# Altium PCB CLLC_PrimarySide_v13.PcbDoc (part 1 of 2)
Units mm, origin at the board's own origin, x right, y up, seen from the top; angles counter-clockwise.
Board outline 161.1 x 167.75 mm, 4 copper layers (GND, SIG, HVDC, GND/OUTPUT), stack 1.369 mm thick; 89 components, 34 nets, 222 pads, 484 vias.
Unrouted connection lines stored in the file: 15.
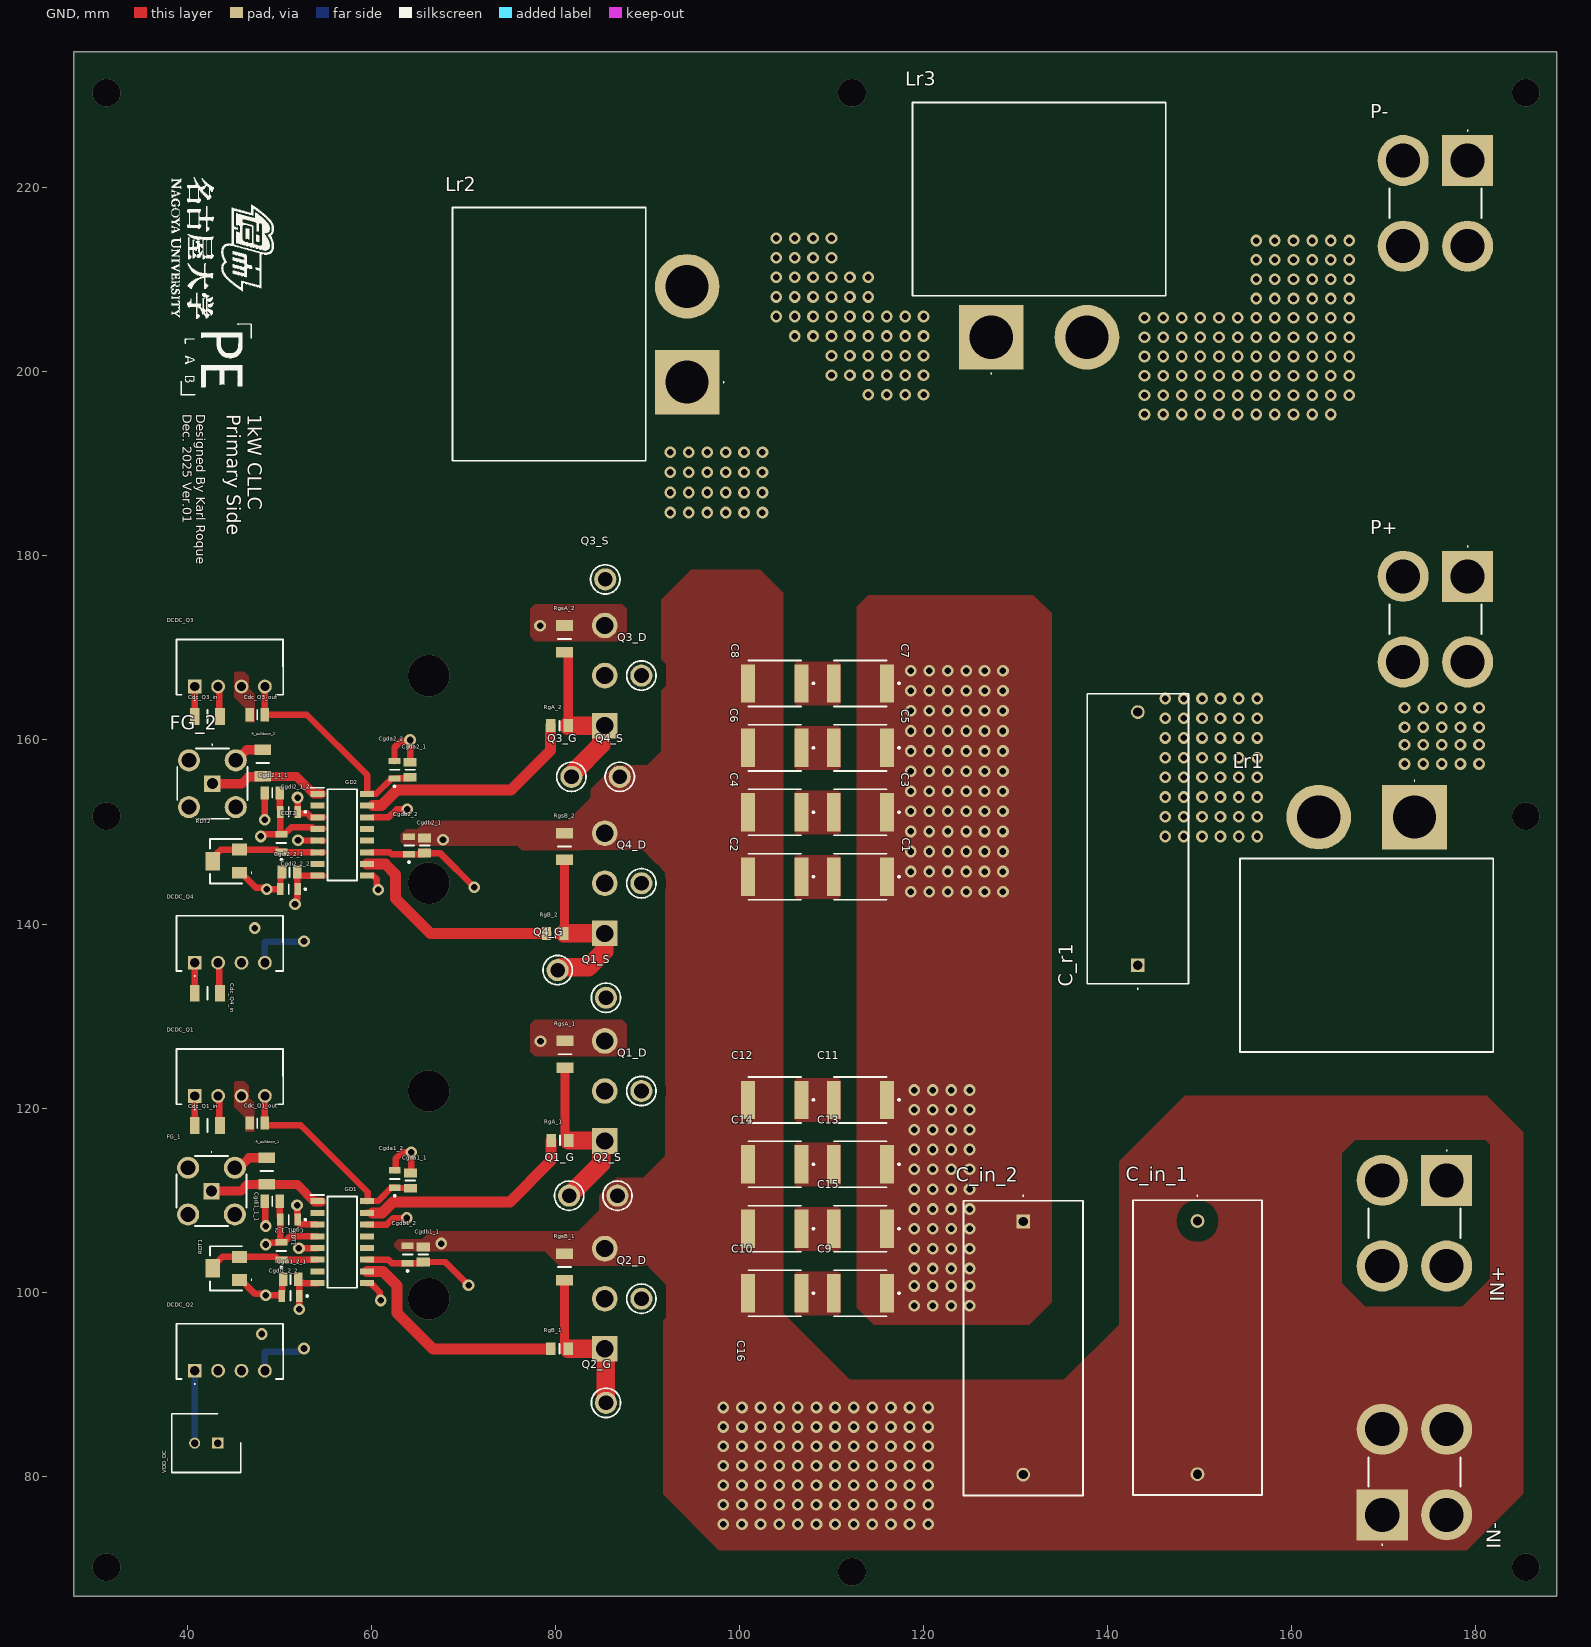
[diagram p0: GND view]
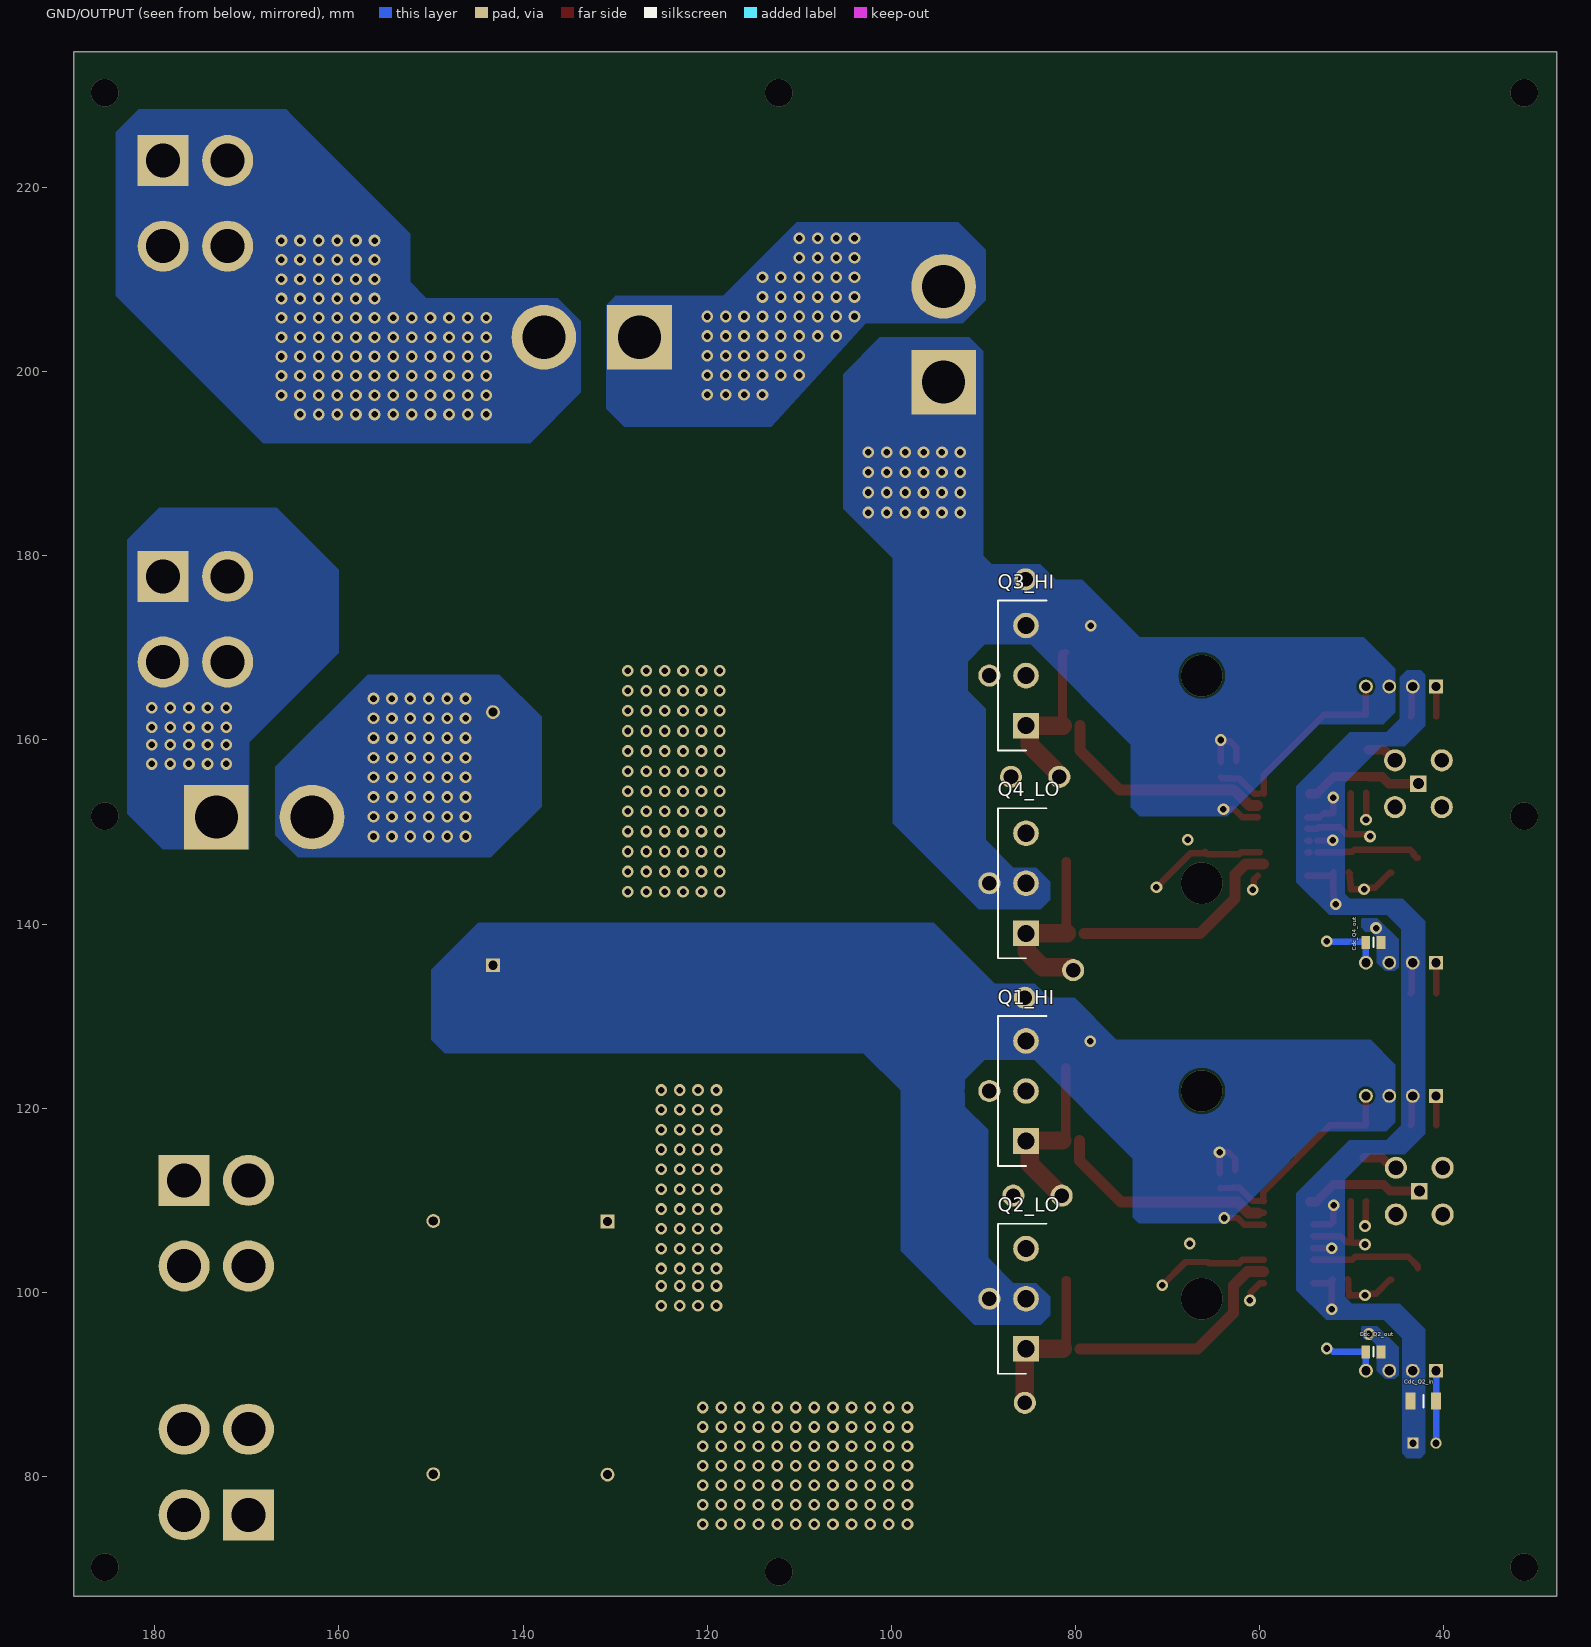
[diagram p1: GND/OUTPUT view, seen from below]
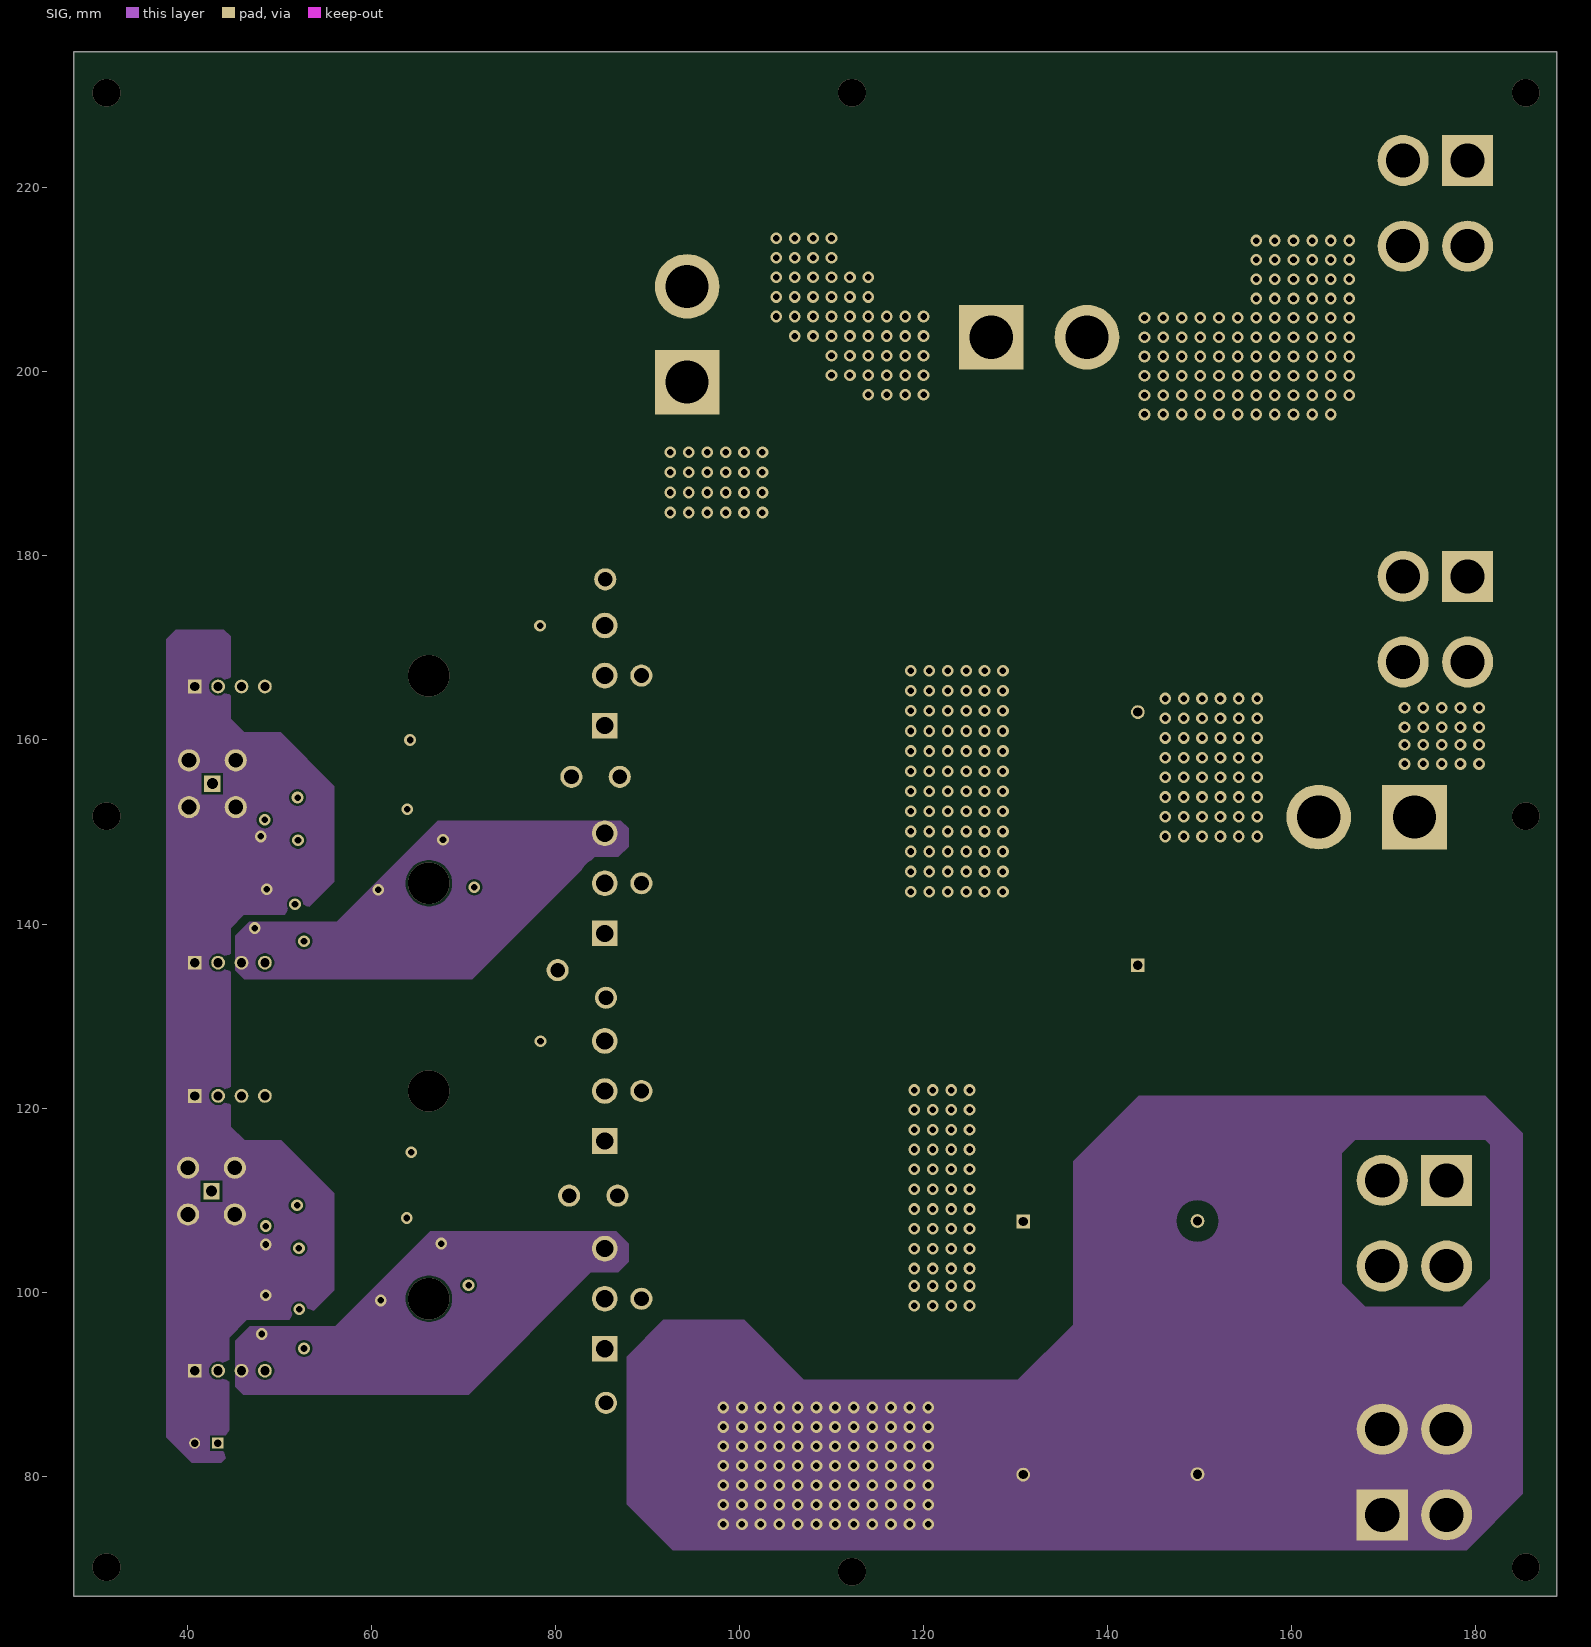
[diagram p2: SIG]
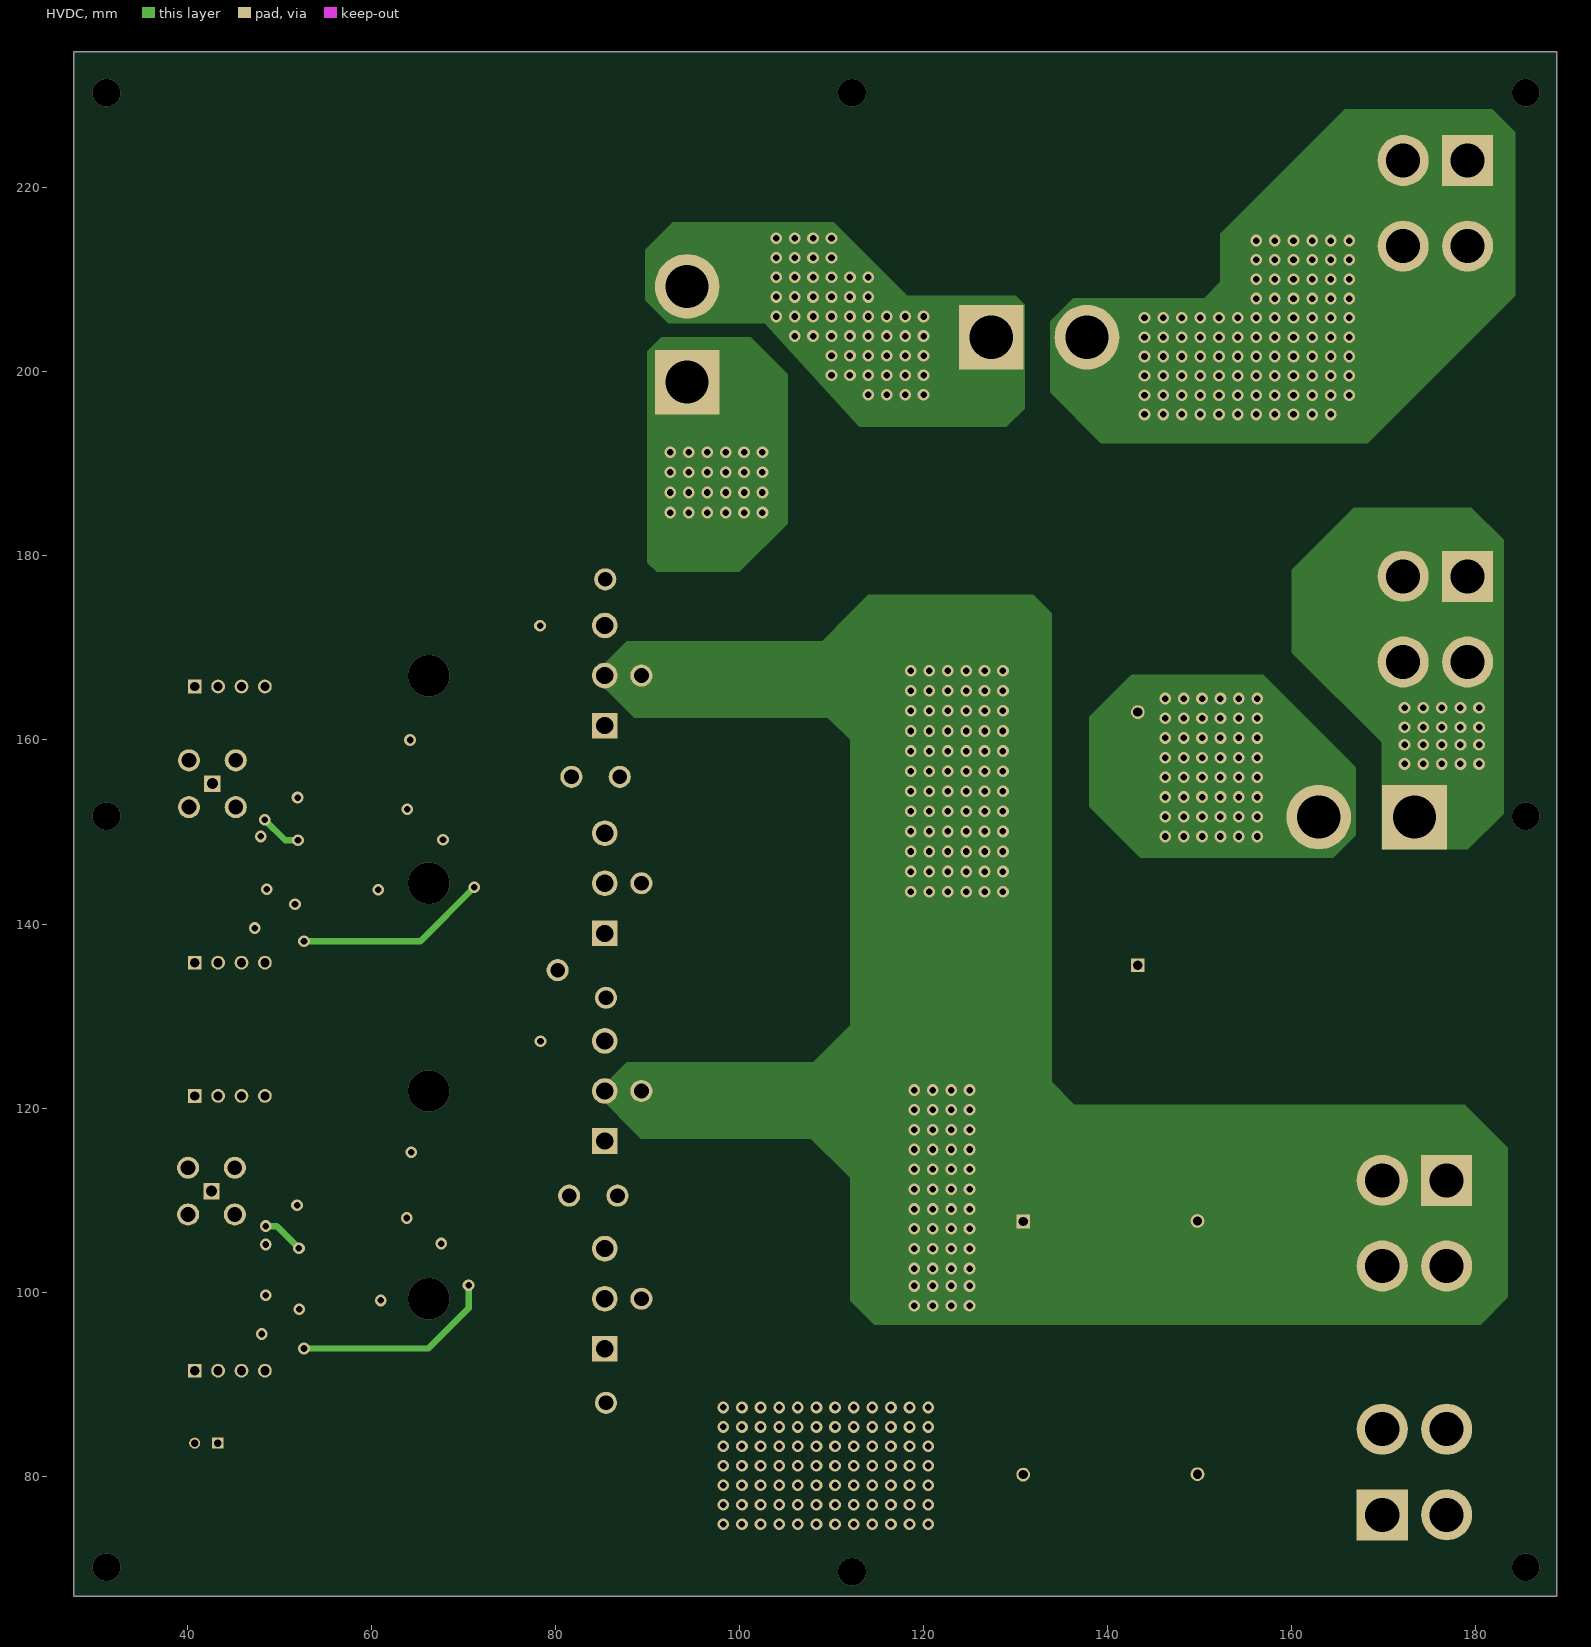
[diagram p3: HVDC]
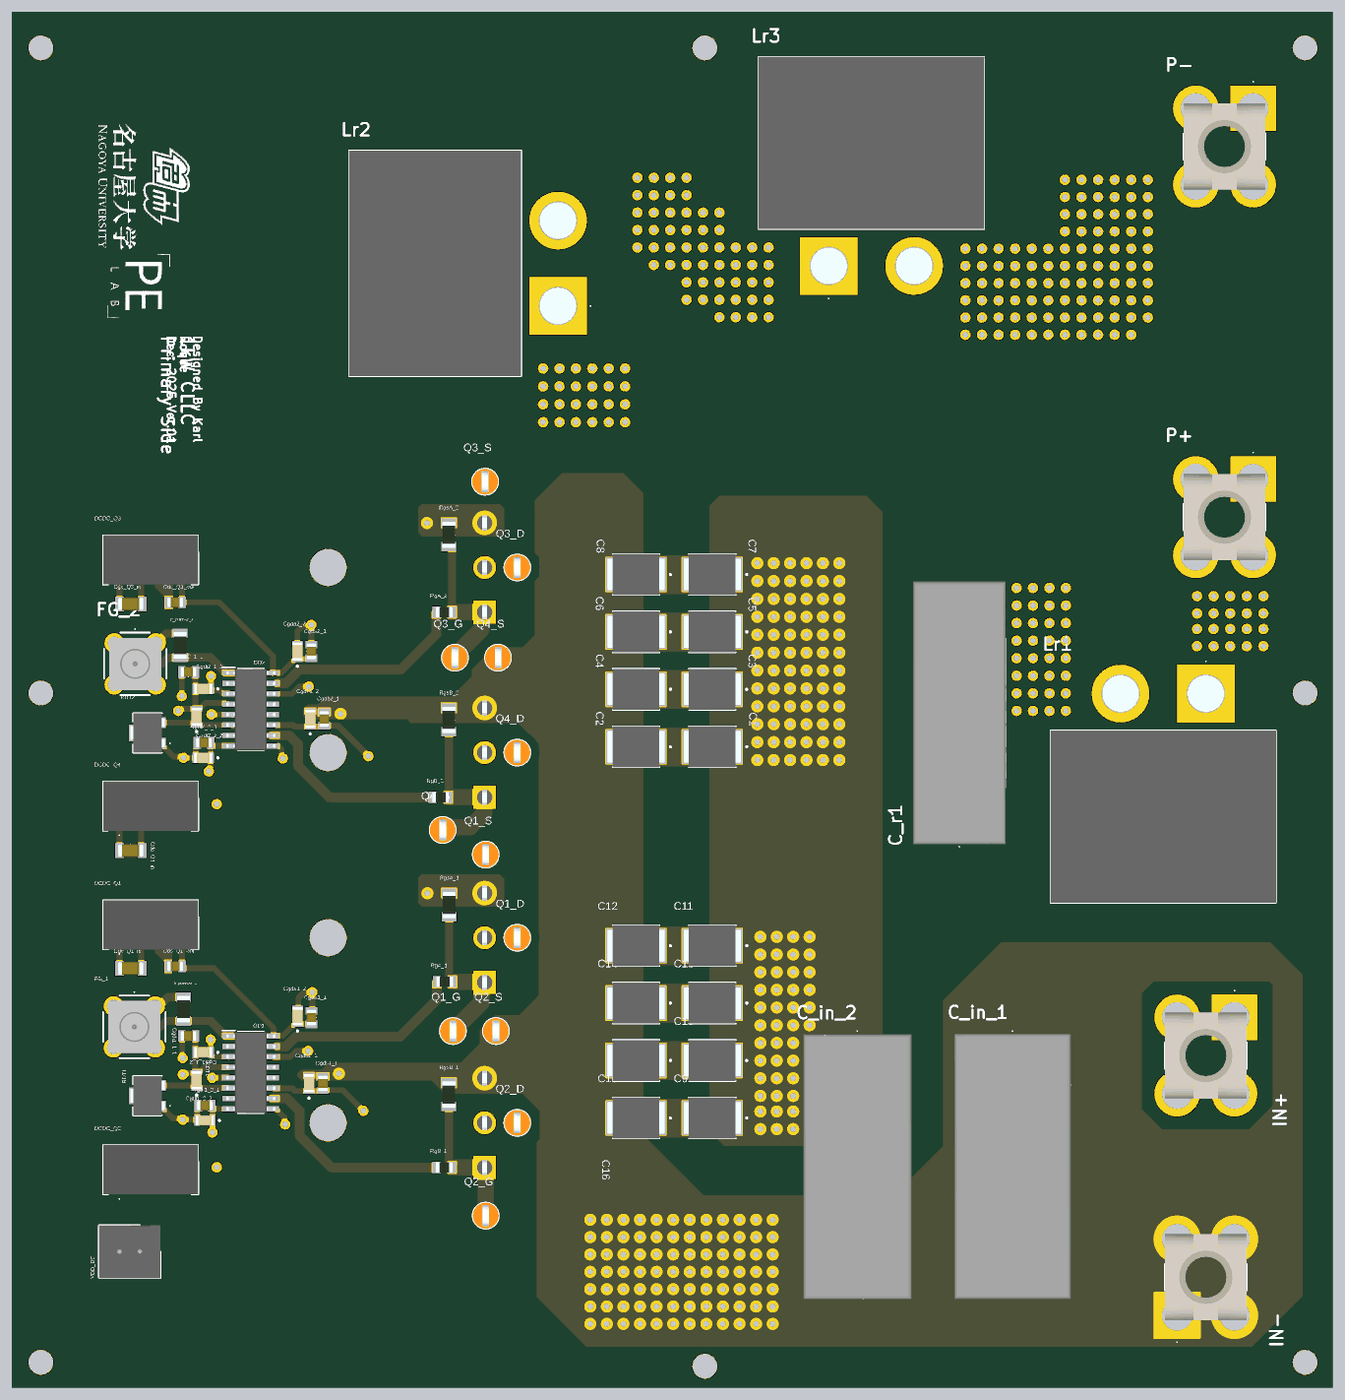
[diagram p5: 3D render of the assembled board from above, using the file's embedded part models]
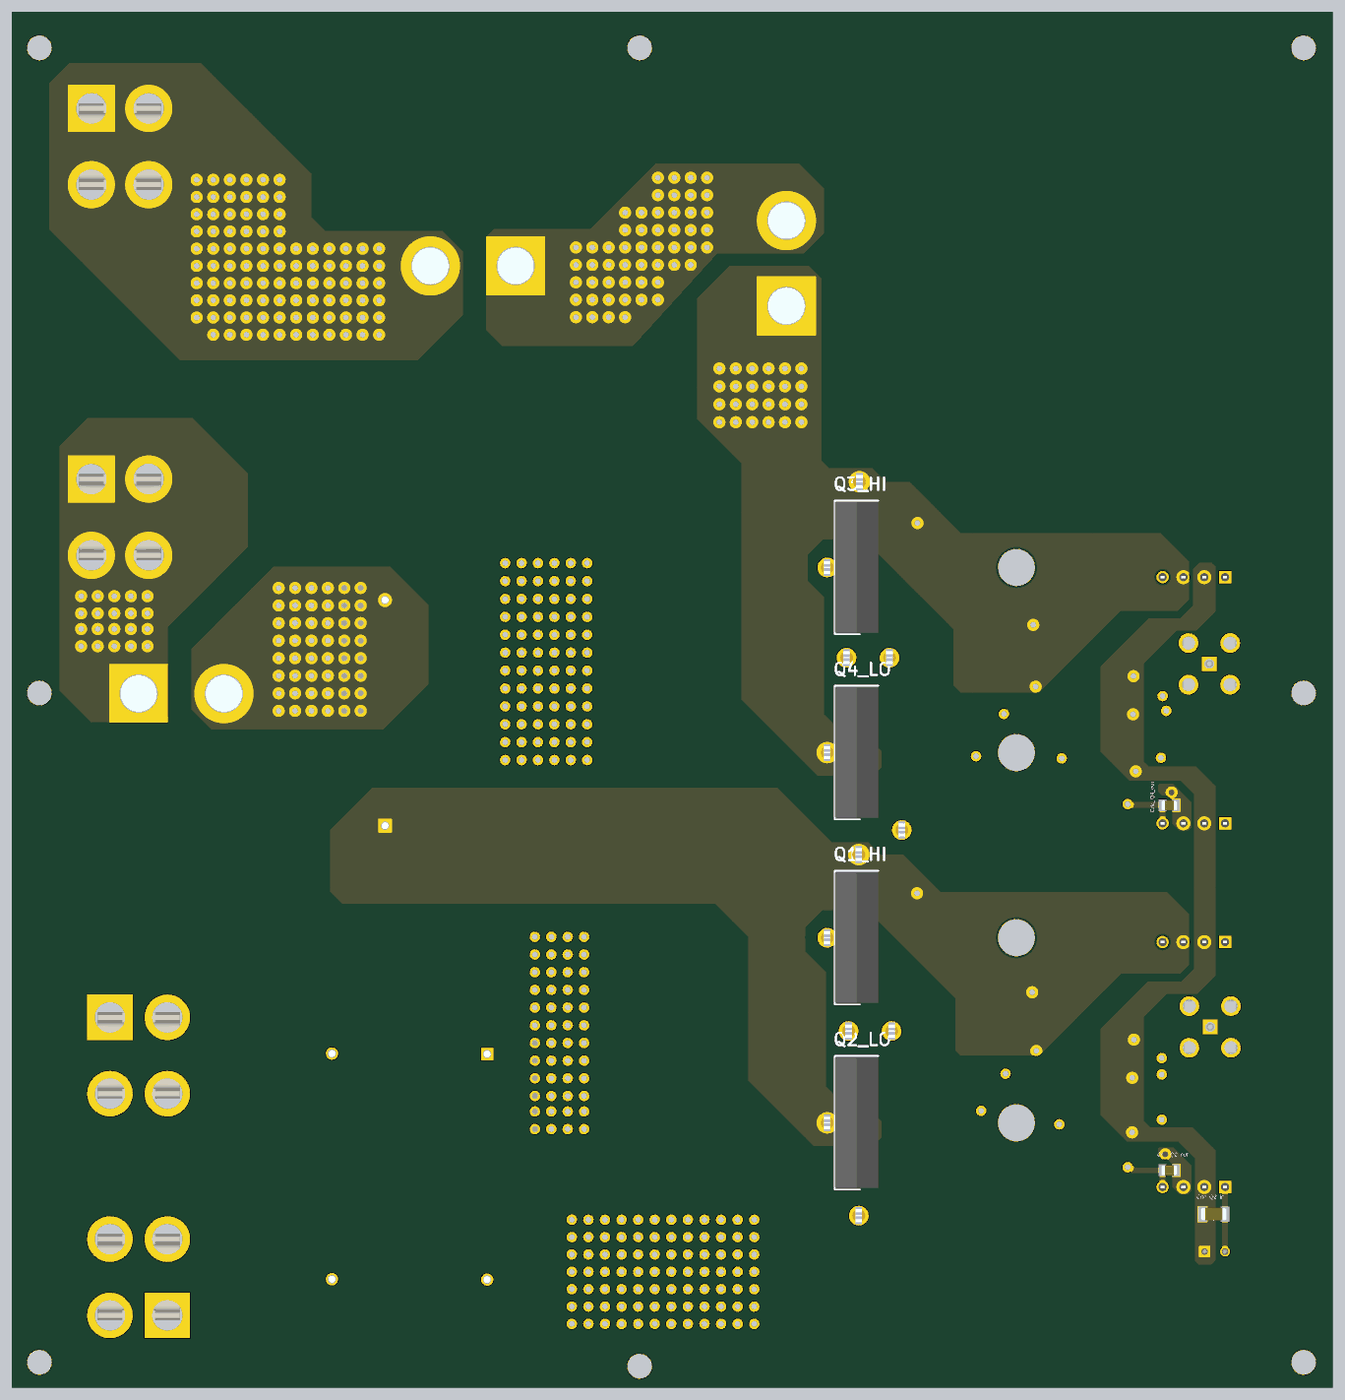
[diagram p6: 3D render of the assembled board from below, using the file's embedded part models]

## Layer stack, top to bottom
Top Solder: solder mask 0.0254, SM-001, Dk 4
GND: signal copper 0.035
Dielectric 1: prepreg 0.1295, PP-017, Dk 4.3
Dielectric 2: prepreg 0.1295, PP-017, Dk 4.3
SIG: signal copper 0.035
Dielectric 3: core 0.7112, Core-039, Dk 4.8
HVDC: signal copper 0.035
Dielectric 4: prepreg 0.1295, PP-017, Dk 4.3
Dielectric 5: prepreg 0.1295, PP-017, Dk 4.3
GND/OUTPUT: signal copper 0.035
Bottom Solder: solder mask 0.0254, SM-001, Dk 4

## Board outline
188.8,234.75 188.8,67 27.7,67 27.7,234.75

## Design rules (kind name [scope] priority, off if disabled: settings)
Clearance Clearance_2 [InNet('Q3_S') vs InNet('Q2_S')] p1: gap=1.5 ignorepadtopadclearanceinfootprint=FALSE
Clearance Clearance_4 [InNet('Q1_D') vs InNet('Q2_S')] p2: gap=1.5 ignorepadtopadclearanceinfootprint=FALSE
Clearance Clearance_1 [InNet('Q1_D') vs InNet('Q1_S')] p3: gap=1.5 ignorepadtopadclearanceinfootprint=FALSE
Clearance [InNet('Q1_S') vs InNet('Q2_S')] p4: gap=1.5 ignorepadtopadclearanceinfootprint=FALSE
Clearance Clearance_3 [All] p5: gap=0.254 ignorepadtopadclearanceinfootprint=FALSE
PolygonConnect PolygonConnect_16 [All vs IsNamedPolygon('GND-Q2_S') Or IsNamedPolygon('NETC1_2_L01_P158') Or IsNamedPolygon('NETC3_2_L01_P157') Or IsNamedPolygon('NETC5_2_L01_P156') Or IsNamedPolygon('NETC7_2_L01_P155') Or IsNamedPolygon('NETC9_2_L01_P162') Or IsNamedPolygon('NETC11_2_L01_P159') Or IsNamedPolygon('NETC13_2_L01_P160') Or IsNamedPolygon('NETC15_2_L01_P161') Or IsNamedPolygon('Q1_D_L01_P102') Or IsNamedPolygon('Q1_S_L01_P130') Or IsNamedPolygon('Q1_S_L01_P195') Or IsNamedPolygon('Q3_S_L01_P129') Or IsNamedPolygon('Q3_S_L01_P194') Or IsNamedPolygon('GND-Q2_S') Or IsNamedPolygon('NETCDC_Q1_IN_2_L02_P172') Or IsNamedPolygon('Q2_S_L02_P173') Or IsNamedPolygon('Q2_S_L02_P197') Or IsNamedPolygon('HVDC-Q1_D') Or IsNamedPolygon('NETC_R1_2_L03_P143') Or IsNamedPolygon('NETLR1_S1_L03_P151') Or IsNamedPolygon('NETLR2_F1_L03_P145') Or IsNamedPolygon('NETLR3_F1_L03_P152') Or IsNamedPolygon('Q3_S_L03_P163') Or IsNamedPolygon('GND/OUTPUT-NetCdc_Q1_in_1') Or IsNamedPolygon('GND/OUTPUT-Q1_S') Or IsNamedPolygon('GND/OUTPUT-Q3_S') Or IsNamedPolygon('NETC_R1_2_L04_P150') Or IsNamedPolygon('NETLR1_S1_L04_P147') Or IsNamedPolygon('NETLR2_F1_L04_P154') Or IsNamedPolygon('NETLR3_F1_L04_P146') Or IsNamedPolygon('Q2_S_L04_P174') Or IsNamedPolygon('Q2_S_L04_P198')] p1: connectstyle=Direct reliefconductorwidth=0.254 reliefentries=4 polygonreliefangle="90 Angle" airgapwidth=0.254
PolygonConnect PolygonConnect_15 [All vs IsNamedPolygon('Q2_S_L04_P198')] p2: thpad.connectstyle=Direct thpad.reliefconductorwidth=0.254 thpad.reliefentries=4 thpad.polygonreliefangle="90 Angle" thpad.airgapwidth=0.254 smdpad.connectstyle=Relief smdpad.reliefconductorwidth=0.254 smdpad.reliefentries=4 smdpad.polygonreliefangle="90 Angle" smdpad.airgapwidth=0.254 via.connectstyle=Relief via.reliefconductorwidth=0.254 via.reliefentries=4 via.polygonreliefangle="90 Angle" via.airgapwidth=0.254
PolygonConnect PolygonConnect_14 [All vs IsNamedPolygon('GND-Q2_S') Or IsNamedPolygon('NETC1_2_L01_P158') Or IsNamedPolygon('NETC3_2_L01_P157') Or IsNamedPolygon('NETC5_2_L01_P156') Or IsNamedPolygon('NETC7_2_L01_P155') Or IsNamedPolygon('NETC9_2_L01_P162') Or IsNamedPolygon('NETC11_2_L01_P159') Or IsNamedPolygon('NETC13_2_L01_P160') Or IsNamedPolygon('NETC15_2_L01_P161') Or IsNamedPolygon('Q1_D_L01_P102') Or IsNamedPolygon('Q1_S_L01_P130') Or IsNamedPolygon('Q1_S_L01_P195') Or IsNamedPolygon('Q3_S_L01_P129') Or IsNamedPolygon('Q3_S_L01_P194') Or IsNamedPolygon('GND-Q2_S') Or IsNamedPolygon('NETCDC_Q1_IN_2_L02_P172') Or IsNamedPolygon('Q2_S_L02_P173') Or IsNamedPolygon('Q2_S_L02_P197') Or IsNamedPolygon('HVDC-Q1_D') Or IsNamedPolygon('NETC_R1_2_L03_P143') Or IsNamedPolygon('NETLR1_S1_L03_P151') Or IsNamedPolygon('NETLR2_F1_L03_P145') Or IsNamedPolygon('NETLR3_F1_L03_P152') Or IsNamedPolygon('Q3_S_L03_P163') Or IsNamedPolygon('GND/OUTPUT-NetCdc_Q1_in_1') Or IsNamedPolygon('GND/OUTPUT-Q1_S') Or IsNamedPolygon('GND/OUTPUT-Q3_S') Or IsNamedPolygon('NETC_R1_2_L04_P150') Or IsNamedPolygon('NETLR1_S1_L04_P147') Or IsNamedPolygon('NETLR2_F1_L04_P154') Or IsNamedPolygon('NETLR3_F1_L04_P146') Or IsNamedPolygon('Q2_S_L04_P174') Or IsNamedPolygon('Q2_S_L04_P198')] p3: thpad.connectstyle=Direct thpad.reliefconductorwidth=0.254 thpad.reliefentries=4 thpad.polygonreliefangle="90 Angle" thpad.airgapwidth=0.254 smdpad.connectstyle=Relief smdpad.reliefconductorwidth=0.254 smdpad.reliefentries=4 smdpad.polygonreliefangle="90 Angle" smdpad.airgapwidth=0.254 via.connectstyle=Relief via.reliefconductorwidth=0.254 via.reliefentries=4 via.polygonreliefangle="90 Angle" via.airgapwidth=0.254
PolygonConnect PolygonConnect_13 [All vs IsNamedPolygon('GND-Q2_S') Or IsNamedPolygon('NETC1_2_L01_P158') Or IsNamedPolygon('NETC3_2_L01_P157') Or IsNamedPolygon('NETC5_2_L01_P156') Or IsNamedPolygon('NETC7_2_L01_P155') Or IsNamedPolygon('NETC9_2_L01_P162') Or IsNamedPolygon('NETC11_2_L01_P159') Or IsNamedPolygon('NETC13_2_L01_P160') Or IsNamedPolygon('NETC15_2_L01_P161') Or IsNamedPolygon('Q1_D_L01_P102') Or IsNamedPolygon('Q1_S_L01_P130') Or IsNamedPolygon('Q1_S_L01_P195') Or IsNamedPolygon('Q3_S_L01_P129') Or IsNamedPolygon('Q3_S_L01_P194') Or IsNamedPolygon('GND-Q2_S') Or IsNamedPolygon('NETCDC_Q1_IN_2_L02_P172') Or IsNamedPolygon('Q2_S_L02_P173') Or IsNamedPolygon('Q2_S_L02_P197') Or IsNamedPolygon('HVDC-Q1_D') Or IsNamedPolygon('NETC_R1_2_L03_P143') Or IsNamedPolygon('NETLR1_S1_L03_P151') Or IsNamedPolygon('NETLR2_F1_L03_P145') Or IsNamedPolygon('NETLR3_F1_L03_P152') Or IsNamedPolygon('Q3_S_L03_P163') Or IsNamedPolygon('GND/OUTPUT-NetCdc_Q1_in_1') Or IsNamedPolygon('GND/OUTPUT-Q1_S') Or IsNamedPolygon('GND/OUTPUT-Q3_S') Or IsNamedPolygon('NETC_R1_2_L04_P150') Or IsNamedPolygon('NETLR1_S1_L04_P147') Or IsNamedPolygon('NETLR2_F1_L04_P154') Or IsNamedPolygon('NETLR3_F1_L04_P146') Or IsNamedPolygon('Q2_S_L04_P174') Or IsNamedPolygon('Q2_S_L04_P198')] p4: thpad.connectstyle=Direct thpad.reliefconductorwidth=0.254 thpad.reliefentries=4 thpad.polygonreliefangle="90 Angle" thpad.airgapwidth=0.254 smdpad.connectstyle=Relief smdpad.reliefconductorwidth=0.254 smdpad.reliefentries=4 smdpad.polygonreliefangle="90 Angle" smdpad.airgapwidth=0.254 via.connectstyle=Relief via.reliefconductorwidth=0.254 via.reliefentries=4 via.polygonreliefangle="90 Angle" via.airgapwidth=0.254
PolygonConnect PolygonConnect_12 [All vs IsNamedPolygon('GND-Q2_S') Or IsNamedPolygon('NETC1_2_L01_P158') Or IsNamedPolygon('NETC3_2_L01_P157') Or IsNamedPolygon('NETC5_2_L01_P156') Or IsNamedPolygon('NETC7_2_L01_P155') Or IsNamedPolygon('NETC9_2_L01_P162') Or IsNamedPolygon('NETC11_2_L01_P159') Or IsNamedPolygon('NETC13_2_L01_P160') Or IsNamedPolygon('NETC15_2_L01_P161') Or IsNamedPolygon('Q1_D_L01_P102') Or IsNamedPolygon('Q1_S_L01_P130') Or IsNamedPolygon('Q1_S_L01_P195') Or IsNamedPolygon('Q3_S_L01_P129') Or IsNamedPolygon('Q3_S_L01_P194') Or IsNamedPolygon('GND-Q2_S') Or IsNamedPolygon('NETCDC_Q1_IN_2_L02_P172') Or IsNamedPolygon('Q2_S_L02_P173') Or IsNamedPolygon('Q2_S_L02_P197') Or IsNamedPolygon('HVDC-Q1_D') Or IsNamedPolygon('NETC_R1_2_L03_P143') Or IsNamedPolygon('NETLR1_S1_L03_P151') Or IsNamedPolygon('NETLR2_F1_L03_P145') Or IsNamedPolygon('NETLR3_F1_L03_P152') Or IsNamedPolygon('Q3_S_L03_P163') Or IsNamedPolygon('GND/OUTPUT-NetCdc_Q1_in_1') Or IsNamedPolygon('GND/OUTPUT-Q1_S') Or IsNamedPolygon('GND/OUTPUT-Q3_S') Or IsNamedPolygon('NETC_R1_2_L04_P150') Or IsNamedPolygon('NETLR1_S1_L04_P147') Or IsNamedPolygon('NETLR2_F1_L04_P154') Or IsNamedPolygon('NETLR3_F1_L04_P146') Or IsNamedPolygon('Q2_S_L04_P174') Or IsNamedPolygon('Q2_S_L04_P184')] p5: connectstyle=Direct reliefconductorwidth=0.254 reliefentries=4 polygonreliefangle="90 Angle" airgapwidth=0.254
PolygonConnect PolygonConnect_11 [All vs IsNamedPolygon('GND-Q2_S') Or IsNamedPolygon('NETC1_2_L01_P158') Or IsNamedPolygon('NETC3_2_L01_P157') Or IsNamedPolygon('NETC5_2_L01_P156') Or IsNamedPolygon('NETC7_2_L01_P155') Or IsNamedPolygon('NETC9_2_L01_P162') Or IsNamedPolygon('NETC11_2_L01_P159') Or IsNamedPolygon('NETC13_2_L01_P160') Or IsNamedPolygon('NETC15_2_L01_P161') Or IsNamedPolygon('Q1_D_L01_P102') Or IsNamedPolygon('Q1_S_L01_P130') Or IsNamedPolygon('Q3_S_L01_P194') Or IsNamedPolygon('Q1_S_L01_P195') Or IsNamedPolygon('Q3_S_L01_P129') Or IsNamedPolygon('NETCDC_Q1_IN_2_L02_P172') Or IsNamedPolygon('Q2_S_L02_P173') Or IsNamedPolygon('Q2_S_L02_P175') Or IsNamedPolygon('HVDC-Q1_D') Or IsNamedPolygon('NETC_R1_2_L03_P143') Or IsNamedPolygon('NETLR1_S1_L03_P151') Or IsNamedPolygon('NETLR2_F1_L03_P145') Or IsNamedPolygon('NETLR3_F1_L03_P152') Or IsNamedPolygon('Q3_S_L03_P163') Or IsNamedPolygon('GND/OUTPUT-NetCdc_Q1_in_1') Or IsNamedPolygon('GND/OUTPUT-Q1_S') Or IsNamedPolygon('GND/OUTPUT-Q3_S') Or IsNamedPolygon('NETC_R1_2_L04_P150') Or IsNamedPolygon('NETLR1_S1_L04_P147') Or IsNamedPolygon('NETLR2_F1_L04_P154') Or IsNamedPolygon('NETLR3_F1_L04_P146') Or IsNamedPolygon('Q2_S_L04_P174') Or IsNamedPolygon('Q2_S_L04_P184')] p6: connectstyle=Direct reliefconductorwidth=0.254 reliefentries=4 polygonreliefangle="90 Angle" airgapwidth=0.254
PolygonConnect PolygonConnect_10 [All vs IsNamedPolygon('GND-Q2_S') Or IsNamedPolygon('NETC1_2_L01_P158') Or IsNamedPolygon('NETC3_2_L01_P157') Or IsNamedPolygon('NETC5_2_L01_P156') Or IsNamedPolygon('NETC7_2_L01_P155') Or IsNamedPolygon('NETC9_2_L01_P162') Or IsNamedPolygon('NETC11_2_L01_P159') Or IsNamedPolygon('NETC13_2_L01_P160') Or IsNamedPolygon('NETC15_2_L01_P161') Or IsNamedPolygon('Q1_D_L01_P102') Or IsNamedPolygon('Q1_S_L01_P130') Or IsNamedPolygon('Q3_S_L01_P129') Or IsNamedPolygon('NETCDC_Q1_IN_2_L02_P172') Or IsNamedPolygon('Q2_S_L02_P173') Or IsNamedPolygon('Q2_S_L02_P175') Or IsNamedPolygon('HVDC-Q1_D') Or IsNamedPolygon('NETC_R1_2_L03_P143') Or IsNamedPolygon('NETLR1_S1_L03_P151') Or IsNamedPolygon('NETLR2_F1_L03_P145') Or IsNamedPolygon('NETLR3_F1_L03_P152') Or IsNamedPolygon('Q3_S_L03_P163') Or IsNamedPolygon('GND/OUTPUT-NetCdc_Q1_in_1') Or IsNamedPolygon('GND/OUTPUT-Q1_S') Or IsNamedPolygon('GND/OUTPUT-Q3_S') Or IsNamedPolygon('NETC_R1_2_L04_P150') Or IsNamedPolygon('NETLR1_S1_L04_P147') Or IsNamedPolygon('NETLR2_F1_L04_P154') Or IsNamedPolygon('NETLR3_F1_L04_P146') Or IsNamedPolygon('Q2_S_L04_P174') Or IsNamedPolygon('Q2_S_L04_P184')] p7: connectstyle=Direct reliefconductorwidth=0.254 reliefentries=4 polygonreliefangle="90 Angle" airgapwidth=0.254
PolygonConnect PolygonConnect_9 [All vs IsNamedPolygon('GND-Q2_S')] p8: connectstyle=Direct reliefconductorwidth=0.254 reliefentries=4 polygonreliefangle="90 Angle" airgapwidth=0.254
PolygonConnect PolygonConnect_8 [All vs IsNamedPolygon('GND-Q2_S') Or IsNamedPolygon('NETC1_2_L01_P158') Or IsNamedPolygon('NETC3_2_L01_P157') Or IsNamedPolygon('NETC5_2_L01_P156') Or IsNamedPolygon('NETC7_2_L01_P155') Or IsNamedPolygon('NETC9_2_L01_P162') Or IsNamedPolygon('NETC11_2_L01_P159') Or IsNamedPolygon('NETC13_2_L01_P160') Or IsNamedPolygon('NETC15_2_L01_P161') Or IsNamedPolygon('Q1_D_L01_P102') Or IsNamedPolygon('Q1_S_L01_P130') Or IsNamedPolygon('Q3_S_L01_P129') Or IsNamedPolygon('NETCDC_Q1_IN_2_L02_P172') Or IsNamedPolygon('Q2_S_L02_P173') Or IsNamedPolygon('Q2_S_L02_P175') Or IsNamedPolygon('HVDC-Q1_D') Or IsNamedPolygon('NETC_R1_2_L03_P143') Or IsNamedPolygon('NETLR1_S1_L03_P151') Or IsNamedPolygon('NETLR2_F1_L03_P145') Or IsNamedPolygon('NETLR3_F1_L03_P152') Or IsNamedPolygon('Q3_S_L03_P163') Or IsNamedPolygon('GND/OUTPUT-NetCdc_Q1_in_1') Or IsNamedPolygon('GND/OUTPUT-No Net') Or IsNamedPolygon('GND/OUTPUT-No Net 1') Or IsNamedPolygon('NETC_R1_2_L04_P150') Or IsNamedPolygon('NETLR1_S1_L04_P147') Or IsNamedPolygon('NETLR2_F1_L04_P154') Or IsNamedPolygon('NETLR3_F1_L04_P146') Or IsNamedPolygon('NONET_L04_P093') Or IsNamedPolygon('NONET_L04_P180') Or IsNamedPolygon('Q2_S_L04_P174') Or IsNamedPolygon('Q2_S_L04_P184') Or IsNamedPolygon('Q3_S_L04_P182')] p9: connectstyle=Direct reliefconductorwidth=0.254 reliefentries=4 polygonreliefangle="90 Angle" airgapwidth=0.254
PolygonConnect PolygonConnect_7 [All vs IsNamedPolygon('GND-Q2_S') Or IsNamedPolygon('NETC1_2_L01_P158') Or IsNamedPolygon('NETC3_2_L01_P157') Or IsNamedPolygon('NETC5_2_L01_P156') Or IsNamedPolygon('NETC7_2_L01_P155') Or IsNamedPolygon('NETC9_2_L01_P162') Or IsNamedPolygon('NETC11_2_L01_P159') Or IsNamedPolygon('NETC13_2_L01_P160') Or IsNamedPolygon('NETC15_2_L01_P161') Or IsNamedPolygon('Q1_D_L01_P102') Or IsNamedPolygon('Q1_S_L01_P130') Or IsNamedPolygon('Q3_S_L01_P129') Or IsNamedPolygon('NETCDC_Q1_IN_2_L02_P096') Or IsNamedPolygon('NONET_L02_P115') Or IsNamedPolygon('Q2_S_L02_P116') Or IsNamedPolygon('HVDC-Q1_D') Or IsNamedPolygon('NETC_R1_2_L03_P143') Or IsNamedPolygon('NETLR1_S1_L03_P151') Or IsNamedPolygon('NETLR2_F1_L03_P145') Or IsNamedPolygon('NETLR3_F1_L03_P152') Or IsNamedPolygon('Q3_S_L03_P163') Or IsNamedPolygon('GND/OUTPUT-No Net') Or IsNamedPolygon('GND/OUTPUT-No Net 1') Or IsNamedPolygon('NETCDC_Q1_IN_1_L04_P095') Or IsNamedPolygon('NETC_R1_2_L04_P150') Or IsNamedPolygon('NETLR1_S1_L04_P147') Or IsNamedPolygon('NETLR2_F1_L04_P154') Or IsNamedPolygon('NETLR3_F1_L04_P146') Or IsNamedPolygon('NONET_L04_P093')] p10: connectstyle=Direct reliefconductorwidth=0.254 reliefentries=4 polygonreliefangle="90 Angle" airgapwidth=0.254
PolygonConnect PolygonConnect_6 [All vs IsNamedPolygon('Q1_D_L01_P102') Or IsNamedPolygon('Q2_S_L01_P103') Or IsNamedPolygon('NETCDC_Q1_IN_2_L02_P096') Or IsNamedPolygon('HVDC-Q1_D') Or IsNamedPolygon('NETCDC_Q1_IN_1_L04_P095') Or IsNamedPolygon('NONET_L04_P093') Or IsNamedPolygon('NONET_L04_P097')] p11: connectstyle=Direct reliefconductorwidth=0.254 reliefentries=4 polygonreliefangle="90 Angle" airgapwidth=0.254
PolygonConnect PolygonConnect_5 [All vs IsNamedPolygon('GND-Q2_S') Or IsNamedPolygon('NONET_L01_P085') Or IsNamedPolygon('NONET_L01_P084') Or IsNamedPolygon('NONET_L01_P083') Or IsNamedPolygon('NONET_L01_P082') Or IsNamedPolygon('NONET_L01_P089') Or IsNamedPolygon('NONET_L01_P086') Or IsNamedPolygon('NONET_L01_P087') Or IsNamedPolygon('NONET_L01_P088') Or IsNamedPolygon('NONET_L01_P090') Or IsNamedPolygon('NONET_L02_P070') Or IsNamedPolygon('SIG-Q1_D') Or IsNamedPolygon('SIG-Q2_S') Or IsNamedPolygon('SIG-Q2_S') Or IsNamedPolygon('HVDC-No Net') Or IsNamedPolygon('NONET_L03_P048') Or IsNamedPolygon('NONET_L03_P080') Or IsNamedPolygon('NONET_L03_P047') Or IsNamedPolygon('GND/OUTPUT-Q1_S') Or IsNamedPolygon('GND/OUTPUT-Q3_S') Or IsNamedPolygon('NONET_L04_P074') Or IsNamedPolygon('NONET_L04_P067') Or IsNamedPolygon('NONET_L04_P049') Or IsNamedPolygon('NONET_L04_P066')] p12: connectstyle=Direct reliefconductorwidth=0.254 reliefentries=4 polygonreliefangle="90 Angle" airgapwidth=0.254
PolygonConnect PolygonConnect_4 [All vs IsNamedPolygon('GND-Q2_S') Or IsNamedPolygon('NONET_L02_P070') Or IsNamedPolygon('SIG-Q1_D') Or IsNamedPolygon('SIG-Q2_S') Or IsNamedPolygon('SIG-Q2_S 1') Or IsNamedPolygon('HVDC-No Net') Or IsNamedPolygon('NONET_L03_P048') Or IsNamedPolygon('NONET_L03_P080') Or IsNamedPolygon('NONET_L03_P047') Or IsNamedPolygon('GND/OUTPUT-Q1_S') Or IsNamedPolygon('GND/OUTPUT-Q3_S') Or IsNamedPolygon('NONET_L04_P074') Or IsNamedPolygon('NONET_L04_P067') Or IsNamedPolygon('NONET_L04_P049') Or IsNamedPolygon('NONET_L04_P066')] p13: connectstyle=Direct reliefconductorwidth=0.254 reliefentries=4 polygonreliefangle="90 Angle" airgapwidth=0.254
PolygonConnect PolygonConnect_3 [All vs IsNamedPolygon('NONET_L04_P070') Or IsNamedPolygon('NONET_L04_P080') Or IsNamedPolygon('NONET_L04_P083') Or IsNamedPolygon('NONET_L04_P082') Or IsNamedPolygon('NONET_L04_P081')] p14: connectstyle=Direct reliefconductorwidth=0.254 reliefentries=4 polygonreliefangle="90 Angle" airgapwidth=0.254
PolygonConnect PolygonConnect_2 [All vs IsNamedPolygon('NONET_L01_P074') Or IsNamedPolygon('NONET_L01_P033') Or IsNamedPolygon('NONET_L01_P032') Or IsNamedPolygon('NONET_L01_P076') Or IsNamedPolygon('Signal_1-Q1_D') Or IsNamedPolygon('GND-Q2_S') Or IsNamedPolygon('NONET_L02_P077') Or IsNamedPolygon('NONET_L02_P068') Or IsNamedPolygon('Int2 (PWR)-Q1_D') Or IsNamedPolygon('Int2 (PWR)-Q1_S') Or IsNamedPolygon('Int2 (PWR)-Q3_S') Or IsNamedPolygon('NONET_L03_P028') Or IsNamedPolygon('NONET_L03_P034') Or IsNamedPolygon('NETLR2_F1_L03_P035') Or IsNamedPolygon('NONET_L03_P056') Or IsNamedPolygon('NONET_L03_P079') Or IsNamedPolygon('NONET_L04_P024') Or IsNamedPolygon('NONET_L04_P026') Or IsNamedPolygon('NONET_L04_P027') Or IsNamedPolygon('NONET_L04_P070') Or IsNamedPolygon('NONET_L04_P023') Or IsNamedPolygon('NONET_L04_P021') Or IsNamedPolygon('NONET_L04_P058') Or IsNamedPolygon('Signal_2-Q1_S')] p15: connectstyle=Direct reliefconductorwidth=0.254 reliefentries=4 polygonreliefangle="90 Angle" airgapwidth=0.254
PolygonConnect PolygonConnect_1 [All vs IsNamedPolygon('Int2 (PWR)-Q1_S') Or IsNamedPolygon('Int2 (PWR)-Q1_S 1') Or IsNamedPolygon('NETC_R1_2_L03_P005')] p16: connectstyle=Direct reliefconductorwidth=0.254 reliefentries=4 polygonreliefangle="90 Angle" airgapwidth=0.254
PolygonConnect [All] p17: connectstyle=Relief reliefconductorwidth=0.254 reliefentries=4 polygonreliefangle="90 Angle" airgapwidth=0.254
RoutingVias [All] p1: holewidth=0.711 width=1.27 viastyle="Through Hole" minholewidth=0.711 minwidth=1.27 maxholewidth=0.711 maxwidth=1.27
SolderMaskExpansion [All] p1: expansion=0.102 istentingtop=FALSE
SupplyNets "Schematic Supply Nets_1" [InNet('Q2_S')] p1: voltage=0.000
Width [All] p1: maxlimit=2 minlimit=0.7 preferedwidth=0.7 midlayer1_maxwidth=0.7 midlayer2_maxwidth=0.7 bottomlayer_maxwidth=0.7 minimp=50.000000 maximp=50.000000 favimp=50.000000
30 further rules are at their usual default settings.

## Classes and differential pairs
component class GD: Cdc_Q1_in Cdc_Q1_out Cdc_Q2_in Cdc_Q2_out Cdc_Q3_in Cdc_Q3_out Cdc_Q4_in Cdc_Q4_out CDT1 CDT2 Cgda1_1 Cgda1_2 Cgda2_1 Cgda2_2 Cgdb1_1 Cgdb1_2 Cgdb2_1 Cgdb2_2 Cgdi1_1_1 Cgdi1_1_2 Cgdi1_2_1 Cgdi1_2_2 Cgdi2_1_1 Cgdi2_1_2 Cgdi2_2_1 Cgdi2_2_2 DCDC_Q1 DCDC_Q2 DCDC_Q3 DCDC_Q4 FG_1 FG_2 GD1 GD2 R_pulldown_1 R_pulldown_2 RDT1 RDT2 RgA_1 RgA_2 RgB_1 RgB_2 RgsA_1 RgsA_2 RgsB_1 RgsB_2 VDD_DC
component class PrimarySide: C1 C2 C3 C4 C5 C6 C7 C8 C9 C10 C11 C12 C13 C14 C15 C16 C_in_1 C_in_2 C_r1 IN+ IN- Lr1 Lr2 Lr3 P+ P- Q1_D Q1_G Q1_HI Q1_S Q2_D Q2_G Q2_LO Q2_S Q3_D Q3_G Q3_HI Q3_S Q4_D Q4_G Q4_LO Q4_S

## Components (designator, comment, footprint, x,y, rotation, side; value= is the part's Value field where it differs from the comment)
C1 "GCJ55DR7LV474KW01K" GCJ55D 113.137,145.15 r180 top
C2 "GCJ55DR7LV474KW01K" GCJ55D 103.837,145.15 r180 top
C3 "GCJ55DR7LV474KW01K" GCJ55D 113.137,152.15 r180 top
C4 "GCJ55DR7LV474KW01K" GCJ55D 103.837,152.15 r180 top
C5 "GCJ55DR7LV474KW01K" GCJ55D 113.137,159.15 r180 top
C6 "GCJ55DR7LV474KW01K" GCJ55D 103.837,159.15 r180 top
C7 "GCJ55DR7LV474KW01K" GCJ55D 113.137,166.15 r180 top
C8 "GCJ55DR7LV474KW01K" GCJ55D 103.837,166.15 r180 top
C9 "GCJ55DR7LV474KW01K" GCJ55D 113.137,99.91 r180 top
C10 "GCJ55DR7LV474KW01K" GCJ55D 103.837,99.91 r180 top
C11 "GCJ55DR7LV474KW01K" GCJ55D 113.137,120.91 r180 top
C12 "GCJ55DR7LV474KW01K" GCJ55D 103.837,120.91 r180 top
C13 "GCJ55DR7LV474KW01K" GCJ55D 113.137,113.91 r180 top
C14 "GCJ55DR7LV474KW01K" GCJ55D 103.837,113.91 r180 top
C15 "GCJ55DR7LV474KW01K" GCJ55D 113.137,106.91 r180 top
C16 "GCJ55DR7LV474KW01K" GCJ55D 103.837,106.91 r180 top
C_in_1 "R71XR510050H0K" R71XR510050H0K 149.75,107.75 r270 top
C_in_2 "R76MR4100SE40K" R76MR4100SE40K 130.825,107.7 r270 top
C_r1 "C4AQQBU4140M1WJ" C4AQQBU4140M1WJ 143.275,135.525 r90 top
Cdc_Q1_in "GRM31CR71H475KA12L" CAPC3216X180N 42.21,118.136 r180 top
Cdc_Q1_out "GCM21BR71H105KA03L" CAPC2012X140N 47.63,118.386 r180 top
Cdc_Q2_in "GRM31CR71H475KA12L" CAPC3216X180N 42.21,88.186 r180 bottom
Cdc_Q2_out "GCM21BR71H105KA03L" CAPC2012X140N 47.63,93.525 r180 bottom
Cdc_Q3_in "GRM31CR71H475KA12L" CAPC3216X180N 42.21,162.555 r180 top
Cdc_Q3_out "GCM21BR71H105KA03L" CAPC2012X140N 47.63,162.75 r180 top
Cdc_Q4_in "GRM31CR71H475KA12L" CAPC3216X180N 42.21,132.5 r180 top
Cdc_Q4_out "GCM21BR71H105KA03L" CAPC2012X140N 47.63,138.011 r180 bottom
CDT1 "GCM21BR72A104MA37K" GCM21 50.25,104.5 r90 top
CDT2 "GCM21BR72A104MA37K" GCM21 50.25,148.8 r90 top
Cgda1_1 "GCM21BR71H105KA03L" CAPC2012X140N 64.257,112.14 r90 top
Cgda1_2 "GCM21BR72A104MA37K" GCM21 62.557,112.3 r90 top
Cgda2_1 "GCM21BR71H105KA03L" CAPC2012X140N 64.232,156.765 r90 top
Cgda2_2 "GCM21BR72A104MA37K" GCM21 62.532,156.77 r90 top
Cgdb1_1 "GCM21BR71H105KA03L" CAPC2012X140N 65.65,104.115 r90 top
Cgdb1_2 "GCM21BR72A104MA37K" GCM21 63.95,104.125 r90 top
Cgdb2_1 "GCM21BR71H105KA03L" CAPC2012X140N 65.807,148.54 r90 top
Cgdb2_2 "GCM21BR72A104MA37K" GCM21 64.107,148.54 r90 top
Cgdi1_1_1 "GCM21BR71H105KA03L" CAPC2012X140N 49.25,109.9 r0 top
Cgdi1_1_2 "GCM21BR72A104MA37K" GCM21 51.05,107.9 r180 top
Cgdi1_2_1 "GCM21BR71H105KA03L" CAPC2012X140N 51.25,101.429 r180 top
Cgdi1_2_2 "GCM21BR72A104MA37K" GCM21 51.24,99.607 r180 top
Cgdi2_1_1 "GCM21BR71H105KA03L" CAPC2012X140N 49.25,154.25 r0 top
Cgdi2_1_2 "GCM21BR72A104MA37K" GCM21 51.05,152.2 r180 top
Cgdi2_2_1 "GCM21BR71H105KA03L" CAPC2012X140N 51.134,145.645 r180 top
Cgdi2_2_2 "GCM21BR72A104MA37K" GCM21 51.05,143.8 r180 top
DCDC_Q1 "PQS075-S5-S15-S" PQS075S5S15S 40.83,121.341 r0 top
DCDC_Q2 "PQS075-S5-S15-S" PQS075S5S15S 40.83,91.491 r0 top
DCDC_Q3 "PQS075-S5-S15-S" PQS075S5S15S 40.83,165.814 r0 top
DCDC_Q4 "PQS075-S5-S15-S" PQS075S5S15S 40.83,135.811 r0 top
FG_1 "413990-1" 4139901 42.65,111 r270 top
FG_2 "413990-1" 4139901 42.75,155.25 r270 top
GD1 "SI8274GB4D-IS1" SOIC127P600X175-16N 56.856,105.455 r0 top
GD2 "SI8274GB4D-IS1" SOIC127P600X175-16N 56.856,149.7 r0 top
IN+ "AMT0450028DB0000G" AMT0450028DB0000G 176.825,112.163 r180 top
IN- "AMT0450028DB0000G" AMT0450028DB0000G 169.825,75.837 r0 top
Lr1 "ER26A2DC-6R8K" ER26A2DC6R8K 173.325,151.625 r180 top
Lr2 "ER26A2DC-6R8K" ER26A2DC6R8K 94.325,198.875 r90 top
Lr3 "ER26A2DC-6R8K" ER26A2DC6R8K 127.35,203.75 r0 top
P+ "AMT0450028DB0000G" AMT0450028DB0000G 179.098,177.775 r180 top
P- "AMT0450028DB0000G" AMT0450028DB0000G 179.098,222.95 r180 top
Q1_D "5013" 5013 89.35,121.872 r270 top
Q1_G "5013" 5013 81.5,110.5 r270 top
Q1_HI "IPW65R050CFD7AXKSA1" TO544P530X1590X2600-3P 85.373,116.432 r90 bottom
Q1_S "5013" 5013 85.5,132 r270 top
Q2_D "5013" 5013 89.35,99.31 r270 top
Q2_G "5013" 5013 85.5,88 r270 top
Q2_LO "IPW65R050CFD7AXKSA1" TO544P530X1590X2600-3P 85.373,93.87 r90 bottom
Q2_S "5013" 5013 86.75,110.5 r270 top
Q3_D "5013" 5013 89.35,166.997 r270 top
Q3_G "5013" 5013 81.75,156 r270 top
Q3_HI "IPW65R050CFD7AXKSA1" TO544P530X1590X2600-3P 85.373,161.557 r90 bottom
Q3_S "5013" 5013 85.425,177.45 r270 top
Q4_D "5013" 5013 89.35,144.434 r270 top
Q4_G "5013" 5013 80.25,135 r270 top
Q4_LO "IPW65R050CFD7AXKSA1" TO544P530X1590X2600-3P 85.373,138.994 r90 bottom
Q4_S "5013" 5013 87,156 r270 top
R_pulldown_1 "ESR18EZPF1002" RESC3216X65N 48.65,113.175 r90 top
R_pulldown_2 "ESR18EZPF1002" RESC3216X65N 48.225,157.5 r90 top
RDT1 "3224W-1-104G" 3224W1104G 44.25,102.614 r180 top
RDT2 "3224W-1-104G" 3224W1104G 44.25,146.83 r180 top
RgA_1 "ESR10EZPF15R0" RESC2012X65N 80.5,116.5 r0 top
RgA_2 "ESR10EZPF15R0" RESC2012X65N 80.45,161.557 r0 top
RgB_1 "ESR10EZPF15R0" RESC2012X65N 80.45,93.87 r0 top
RgB_2 "ESR10EZPF15R0" RESC2012X65N 80,138.994 r0 top
RgsA_1 "ESR18EZPF1002" RESC3216X65N 81.05,125.862 r90 top
RgsA_2 "ESR18EZPF1002" RESC3216X65N 81,170.987 r90 top
RgsB_1 "ESR18EZPF1002" RESC3216X65N 81,102.75 r90 top
RgsB_2 "ESR18EZPF1002" RESC3216X65N 81,148.424 r90 top
VDD_DC "B02B-XASK-1_LF__SN_" SHDR2W60P0X250_1X2_750X640X880P 43.33,83.62 r180 top

## Footprints (in the part's own frame and the unit in brackets; to place one, negate y for a bottom-side part, rotate by r counter-clockwise, add the part's x,y. Pads: shape width x height; smd on the part's side, far side on the other; paste and mask are expansions set on the pad)
3224W1104G [mm]
  rect 1.6x1.3 smd: 1(-1.45,1.25) 3(-1.45,-1.25)
  rect 1.6x2 smd: 2(1.45,0)
  silkscreen extent -2.8,-2.4 1.75,2.4, body extent -2.12,-2.4 2.09,2.4, height 5.65
5013 [mm]
  round 2.4 hole 1.6: 1(0,0)
  silkscreen extent -1.59,-1.59 1.59,1.59, body extent -1.58,-1.59 1.58,1.59, height 8.63
4139901 [mm]
  rect 1.785x1.785 hole 1.19: 1(0,0)
  round 2.4 hole 1.6: 2(-2.54,-2.54) 3(2.54,-2.54) 4(2.54,2.54) 5(-2.54,2.54)
  silkscreen extent -4.3,-3.81 3.81,3.81, body extent -3.18,-3.18 3.18,3.18, height 8.05
AMT0450028DB0000G [mm]
  rect 5.55x5.55 hole 3.7: 1(0,0)
  round 5.55 hole 3.7: 2(0,9.3) 3(7,0) 4(7,9.3)
  silkscreen extent -1.5,-3.3 8.5,6.25, body extent -1.5,-0.6 8.5,9.9, height 7.59
C4AQQBU4140M1WJ [mm]
  rect 1.5x1.5 hole 1: 1(0,0)
  round 1.5 hole 1: 2(27.5,0)
  silkscreen extent -2.6,-5.5 29.5,5.5, body extent -2.25,-5.66 29.75,5.65, height 20.16
CAPC2012X140N [mm]
  rect 0.94x1.43 smd: 1(-0.82,0) 2(0.82,0)
  silkscreen extent 0,-0.53 0,0.53, body extent -1,-0.63 1,0.63, height 1.4
CAPC3216X180N [mm]
  rect 1.07x1.82 smd: 1(-1.38,0) 2(1.38,0)
  silkscreen extent 0,-0.7 0,0.7, body extent -1.6,-0.8 1.6,0.8, height 1.8
ER26A2DC6R8K [mm]
  round 7.02 hole 4.68: F1(10.4,0)
  rect 7.02x7.02 hole 4.68: S1(0,0)
  silkscreen extent -8.55,-4 18.95,25.5, body extent -8.55,-2.23 18.95,25.5, height 17.1
GCJ55D [mm]
  rect 1.5x4.15 smd: 1(-2.9,0) 2(2.9,0)
  silkscreen extent -4.3,-2.5 2.85,2.5, body extent -3.5,-2.5 3.5,2.5, height 2.1
GCM21 [mm]
  rect 0.7x1.3 smd: 1(-0.95,0) 2(0.95,0)
  silkscreen extent -1.9,-0.53 0,0.53, body extent -1.1,-0.63 1.1,0.63, height 1.45
PQS075S5S15S [mm]
  rect 1.5x1.5 hole 1: 1(0,0)
  round 1.5 hole 1: 2(2.54,0) 3(5.08,0) 4(7.62,0)
  silkscreen extent -1.99,-1.5 9.61,5.1, body extent -1.99,-0.89 9.61,5.1, height 10.26
R71XR510050H0K [mm]
  round 1.5 hole 1: 1(0,0) 2(27.5,0)
  silkscreen extent -2.8,-7 29.75,7, body extent -2.4,-7.1 29.9,7.1, height 28.1
R76MR4100SE40K [mm]
  rect 1.5x1.5 hole 1: 1(0,0)
  round 1.5 hole 1: 2(27.5,0)
  silkscreen extent -2.85,-6.5 29.75,6.5, body extent -2.4,-6.61 29.9,6.6, height 23.39
RESC2012X65N [mm]
  rect 1x1.4 smd: 1(-0.95,0) 2(0.95,0)
  silkscreen extent 0,-0.53 0,0.53, body extent -1,-0.63 1,0.63, height 0.65
RESC3216X65N [mm]
  rect 1.15x1.8 smd: 1(-1.45,0) 2(1.45,0)
  silkscreen extent 0,-0.7 0,0.7, body extent -1.6,-0.8 1.6,0.8, height 0.65
SHDR2W60P0X250_1X2_750X640X880P [mm]
  rect 1.2x1.2 hole 0.8: 1(0,0)
  round 1.2 hole 0.8: 2(2.5,0)
  silkscreen extent -2.5,-3.2 5,3.2, body extent -2.5,-3.2 5,3.2, height 8.8
SOIC127P600X175-16N [mm]
  rect 1.5x0.65 smd: 1(-2.7,4.445) 2(-2.7,3.175) 3(-2.7,1.905) 4(-2.7,0.635) 5(-2.7,-0.635) 6(-2.7,-1.905) 7(-2.7,-3.175) 8(-2.7,-4.445) 9(2.7,-4.445) 10(2.7,-3.175) 11(2.7,-1.905) 12(2.7,-0.635) 13(2.7,0.635) 14(2.7,1.905) 15(2.7,3.175) 16(2.7,4.445)
  silkscreen extent -3.45,-4.95 1.6,5.12, body extent -3,-4.95 3,4.95, height 1.75
TO544P530X1590X2600-3P [mm]
  rect 2.79x2.79 hole 1.86: 1(0,0)
  round 2.79 hole 1.86: 2(5.44,0) 3(10.88,0)
  silkscreen extent -2.71,-2.25 13.59,3.05, body extent -2.51,-2.26 13.39,3.05, height 26

## Part data
C1 C2 C3 C4 C5 C6 C7 C8 C9 C10 C11 C12 C13 C14 C15 C16: "Capacitor", Manufacturer_Name="Murata Electronics", Mouser Part Number=81-GCJ55D7LV474KW01K, Datasheet Link=https://search.murata.co.jp/Ceramy/image/img/A01X/G101/ENG/GCJ55DR7LV474KW01-00B.pdf, Height=2mm, Manufacturer_Part_Number=GCJ55DR7LV474KW01K, Mouser Price/Stock=https://www.mouser.co.uk/ProductDetail/Murata-Electronics/GCJ55DR7LV474KW01K?qs=By6Nw2ByBD00cj4z4sTn5Q%3D%3D
C_in_1: "Capacitor", Manufacturer_Name=KEMET, Mouser Part Number=80-R71XR510050H0K, Arrow Part Number=R71XR510050H0K, Arrow Price/Stock=https://www.arrow.com/en/products/r71xr510050h0k/kemet-corporation?region=europe, Datasheet Link=https://content.kemet.com/datasheets/KEM_F3130_R71H.pdf, Height=28.1mm, Manufacturer_Part_Number=R71XR510050H0K, Mouser Price/Stock=https://www.mouser.co.uk/ProductDetail/KEMET/R71XR510050H0K?qs=Jslch3jnSjmgqBZUL0Ww4w%3D%3D
C_in_2: "Capacitor", Manufacturer_Name=KEMET, Mouser Part Number=80-R76MR4100SE40K, Arrow Part Number=R76MR4100SE40K, Arrow Price/Stock=https://www.arrow.com/en/products/r76mr4100se40k/kemet-corporation, Datasheet Link=https://search.kemet.com/component-documentation/download/specsheet/R76MR4100SE40K, Height=22.1mm, Manufacturer_Part_Number=R76MR4100SE40K, Mouser Price/Stock=https://www.mouser.com/Search/Refine.aspx?Keyword=80-R76MR4100SE40K
C_r1: "Capacitor", Manufacturer_Name=KEMET, Mouser Part Number=80-C4AQQBU4140M1WJ, Datasheet Link=https://search.kemet.com/component-documentation/download/specsheet/C4AQQBU4140M1WJ, Height=20.2mm, Manufacturer_Part_Number=C4AQQBU4140M1WJ, Mouser Price/Stock=https://www.mouser.co.uk/ProductDetail/KEMET/C4AQQBU4140M1WJ?qs=81r%252BiQLm7BSMlBltxrghzA%3D%3D
Cdc_Q1_in Cdc_Q2_in Cdc_Q3_in Cdc_Q4_in: "Capacitor", Manufacturer_Name="Murata Electronics", Mouser Part Number=81-GRM31CR71H475KA2L, Arrow Part Number=GRM31CR71H475KA12L, Arrow Price/Stock=https://www.arrow.com/en/products/grm31cr71h475ka12l/murata-manufacturing?utm_currency=USD&region=nac, Datasheet Link=https://search.murata.co.jp/Ceramy/image/img/A01X/G101/ENG/GRM31CR71H475KA12-01A.pdf, Height=1.8mm, Manufacturer_Part_Number=GRM31CR71H475KA12L, Mouser Price/Stock=https://www.mouser.co.uk/ProductDetail/Murata-Electronics/GRM31CR71H475KA12L?qs=QOxk%252BkhTc6I%252BVQUsJuOHog%3D%3D
Cdc_Q1_out Cdc_Q2_out Cdc_Q3_out Cdc_Q4_out Cgda1_1 Cgda2_1 Cgdb1_1 Cgdb2_1 Cgdi1_1_1 Cgdi1_2_1 Cgdi2_1_1 Cgdi2_2_1: "Capacitor", Manufacturer_Name="Murata Electronics", Mouser Part Number=81-GCM21BR71H105KA3L, Arrow Part Number=GCM21BR71H105KA03L, Arrow Price/Stock=https://www.arrow.com/en/products/gcm21br71h105ka03l/murata-manufacturing?utm_currency=USD&region=nac, Datasheet Link=https://search.murata.co.jp/Ceramy/image/img/A01X/G101/ENG/GCM21BR71H105KA03-01A.pdf, Height=1.4mm, Manufacturer_Part_Number=GCM21BR71H105KA03L, Mouser Price/Stock=https://www.mouser.co.uk/ProductDetail/Murata-Electronics/GCM21BR71H105KA03L?qs=74rrZF77WIzs3UJkpPZdKw%3D%3D
CDT1 CDT2 Cgda1_2 Cgda2_2 Cgdb1_2 Cgdb2_2 Cgdi1_1_2 Cgdi1_2_2 Cgdi2_1_2 Cgdi2_2_2: "Capacitor", Manufacturer_Name="Murata Electronics", Datasheet Link=https://search.murata.co.jp/Ceramy/image/img/A01X/G101/ENG/GCM21BR72A104MA37-01A.pdf, Height=1.4mm, Manufacturer_Part_Number=GCM21BR72A104MA37K
DCDC_Q1 DCDC_Q2 DCDC_Q3 DCDC_Q4: "Integrated Circuit", Manufacturer_Name="CUI Inc.", Mouser Part Number=490-PQS075-S5-S15-S, Datasheet Link=https://www.cui.com/product/resource/pdf/pqs075-s.pdf, Height=10.41mm, Manufacturer_Part_Number=PQS075-S5-S15-S, Mouser Price/Stock=https://www.mouser.co.uk/ProductDetail/CUI-Inc/PQS075-S5-S15-S/?qs=26oI9%252Bq63sIfifa58tSGNg%3D%3D
FG_1 FG_2: "Connector", Manufacturer_Name="TE Connectivity", Mouser Part Number=571-4139901, Arrow Part Number=413990-1, Arrow Price/Stock=https://www.arrow.com/en/products/413990-1/te-connectivity?region=europe, Datasheet Link=https://www.te.com/commerce/DocumentDelivery/DDEController?Action=srchrtrv&DocNm=1307191_SMB_Connectors&DocType=Catalog%20Section&DocLang=English&PartCntxt=413990-1&DocFormat=pdf, Height=7.62mm, Manufacturer_Part_Number=413990-1, Mouser Price/Stock=https://www.mouser.co.uk/ProductDetail/TE-Connectivity/413990-1?qs=7QuPeZUaY4GhWa7hqv5PMQ%3D%3D
GD1 GD2: "Integrated Circuit", Manufacturer_Name=Skyworks, Mouser Part Number=634-SI8274GB4D-IS1, Datasheet Link=https://www.skyworksinc.com/-/media/Skyworks/SL/documents/public/data-sheets/Si827x.pdf, Height=1.75mm, Manufacturer_Part_Number=SI8274GB4D-IS1, Mouser Price/Stock=https://www.mouser.co.uk/ProductDetail/Skyworks-Solutions-Inc/SI8274GB4D-IS1?qs=j6MGy4L9yX3Ou%2FIj7aSdKQ%3D%3D
IN+ IN- P+ P-: "Connector", Manufacturer_Name=Amphenol, Mouser Part Number=523-AMT0450028DB000G, Datasheet Link=https://www.anytek.com.cn/Upload/AMT45028DB-821f25108d7e4e0caa268ff3448ada5b.pdf, Height=7.4mm, Manufacturer_Part_Number=AMT0450028DB0000G, Mouser Price/Stock=https://www.mouser.co.uk/ProductDetail/Amphenol-Anytek/AMT0450028DB0000G?qs=ST9lo4GX8V0in%252BhOLfQ9xA%3D%3D
Lr1 Lr2 Lr3: "Inductor", Manufacturer_Name=Bourns, Datasheet Link=https://www.bourns.com/docs/product-datasheets/er26a.pdf, Height=17mm, Manufacturer_Part_Number=ER26A2DC-6R8K
Q1_D Q1_G Q1_S Q2_D Q2_G Q2_S Q3_D Q3_G Q3_S Q4_D Q4_G Q4_S: "Test Point", Manufacturer_Name="Keystone Electronics", Mouser Part Number=534-5013, Manufacturer_Part_Number=5013, Height=8.28mm, Datasheet Link=http://www.keyelco.com/product-pdf.cfm?p=1322, Mouser Price/Stock=https://www.mouser.co.uk/ProductDetail/Keystone-Electronics/5013?qs=qOqV1E1P08RLig9vMFtXag%3D%3D
Q1_HI Q2_LO Q3_HI Q4_LO: "MOSFET (N-Channel)", Manufacturer_Name=Infineon, Mouser Part Number=726-IPW65R050CFD7AXK, Arrow Part Number=IPW65R050CFD7AXKSA1, Arrow Price/Stock=https://www.arrow.com/en/products/ipw65r050cfd7axksa1/infineon-technologies-ag?region=europe, Datasheet Link=https://www.infineon.com/dgdl/Infineon-IPW65R050CFD7A-DataSheet-v02_01-EN.pdf?fileId=5546d46271bf4f920171c0167ea2084c, Height=5.3mm, Manufacturer_Part_Number=IPW65R050CFD7AXKSA1, Mouser Price/Stock=https://www.mouser.co.uk/ProductDetail/Infineon-Technologies/IPW65R050CFD7AXKSA1?qs=OlC7AqGiEDm4ztoS376shw%3D%3D
R_pulldown_1 R_pulldown_2 RgsA_1 RgsA_2 RgsB_1 RgsB_2: "Resistor", Manufacturer_Name="ROHM Semiconductor", Mouser Part Number=755-ESR18EZPF1002, Arrow Part Number=ESR18EZPF1002, Arrow Price/Stock=https://www.arrow.com/en/products/esr18ezpf1002/rohm-semiconductor, Datasheet Link=https://datasheet.datasheetarchive.com/originals/distributors/Datasheets_SAMA/30ccb516c688c96e56c83a00b77a93f4.pdf, Height=0.65mm, Manufacturer_Part_Number=ESR18EZPF1002, Mouser Price/Stock=https://www.mouser.com/Search/Refine.aspx?Keyword=755-ESR18EZPF1002
RDT1 RDT2: "Variable Resistor", Manufacturer_Name=Bourns, Mouser Part Number=652-3224W-1-104G, Arrow Part Number=3224W-1-104G, Arrow Price/Stock=https://www.arrow.com/en/products/3224w-1-104g/bourns, Datasheet Link=https://www.bourns.com/docs/product-datasheets/3224.pdf?sfvrsn=c872982f_10, Height=5.55mm, Manufacturer_Part_Number=3224W-1-104G, Mouser Price/Stock=https://www.mouser.co.uk/ProductDetail/Bourns/3224W-1-104G?qs=tEaODSGlU8NOeIAULE3a4g%3D%3D
RgA_1 RgA_2 RgB_1 RgB_2: "Resistor", Manufacturer_Name="ROHM Semiconductor", Mouser Part Number=755-ESR10EZPF15R0, Datasheet Link=https://fscdn.rohm.com/en/products/databook/datasheet/passive/resistor/chip_resistor/esr-e.pdf, Height=0.65mm, Manufacturer_Part_Number=ESR10EZPF15R0, Mouser Price/Stock=https://www.mouser.co.uk/ProductDetail/ROHM-Semiconductor/ESR10EZPF15R0?qs=DyUWGjl%252BcVuuTlFPYREySw%3D%3D
VDD_DC: "Connector", Arrow Part Number=B02B-XASK-1(LF)(SN), Manufacturer_Name="JST (JAPAN SOLDERLESS TERMINALS)", Mouser Part Number=N/A, Arrow Price/Stock=https://www.arrow.com/en/products/b02b-xask-1-lf-sn/jst-manufacturing?utm_currency=USD&region=europe, Datasheet Link=http://www.jst-mfg.com/product/pdf/eng/eXA1.pdf, Height=8.8mm, Manufacturer_Part_Number=B02B-XASK-1(LF)(SN), Mouser Price/Stock=https://www.mouser.co.uk/ProductDetail/JST-Commercial/B02B-XASK-1LFSN?qs=IKkN%2F947nfBty2GocXf7QA%3D%3D

## Via types
v1: diameter 1.27, hole 0.711, GND to GND/OUTPUT, 472 vias
v2: diameter 3, hole 3, GND to GND/OUTPUT, 8 vias
v3: diameter 4.5, hole 4.5, GND to GND/OUTPUT, 4 vias